# Altium PCB ScreenerMobo.PcbDoc (part 4 of 5)
Units mm, origin at the board's own origin, x right, y up, seen from the top; angles counter-clockwise.
Board outline 145 x 180 mm, 2 copper layers (Top Layer, Bottom Layer); 434 components, 355 nets, 1806 pads, 3000 vias.
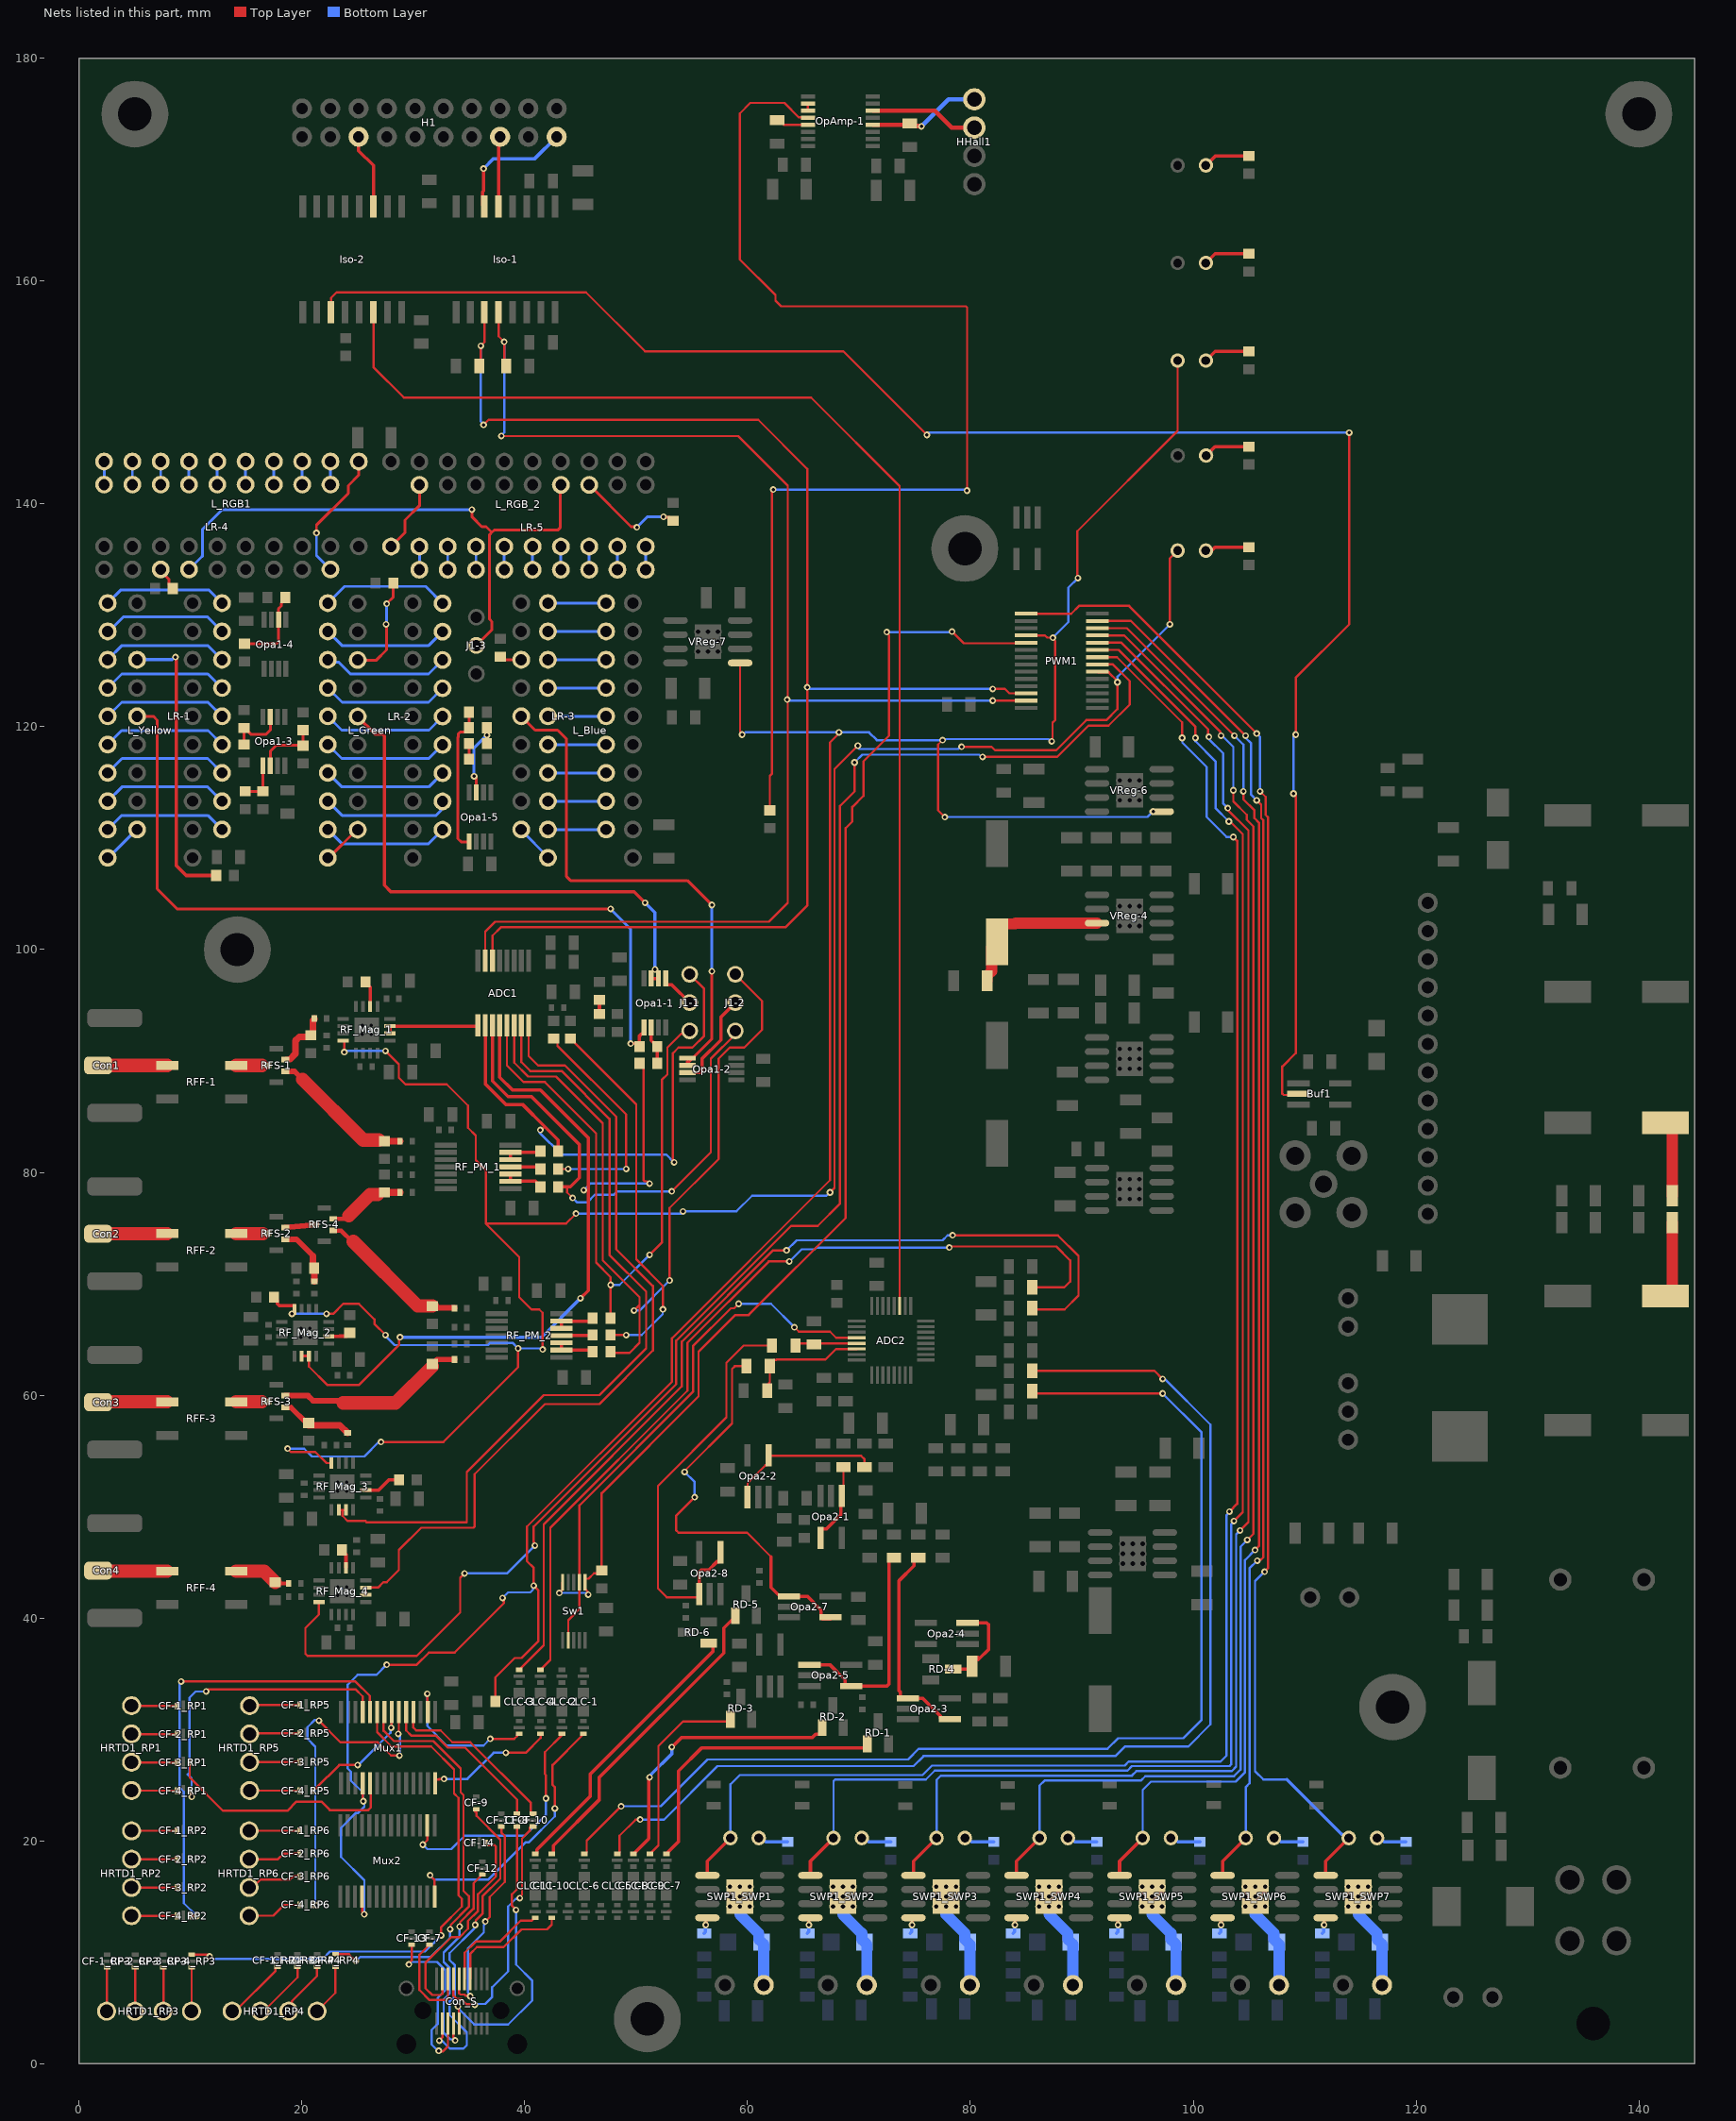
[diagram p4: the nets of this part, all layers, seen from the top]

## Via types
v1: diameter 0.6, hole 0.3, Top Layer to Bottom Layer, tented both sides, 1967 vias
v2: diameter 0.5, hole 0.25, Top Layer to Bottom Layer, tented both sides, 1025 vias
v3: diameter 0.9, hole 0.5, Top Layer to Bottom Layer, tented both sides, 8 vias

## Nets (pads, with @x,y where several pads share a name; then routed paths per layer and width w, separated by ;. In a path a pad name is that pad's centre, name@x,y a point inside that pad or via, vN(x,y) a via of type N, cw(c..) or ccw(c..) an arc to the next point about the centre after c; other vN are vias at no path point) (continued)
NetC6-18_2: C6-18.2 CE3-8.1 VReg-4.3 | length 14.2
  Top Layer w1: C6-18.2@81.5,97.2 81.5,97.65 81.9,98.05 81.9,100.2 CE3-8.1@82.4,100.7 82.4,101.8 82.9,102.3 84,102.3 84.076,102.376 VReg-4.3@91.368,102.376
NetC8-15_1: C8-15.1 OpAmp-1.13 | length 2.9
  Top Layer w0.2: C8-15.1@62.65,174.45 62.85,174.45 63.255,174.045 OpAmp-1.13@65.408,174.045
NetC8-16_2: C8-16.2 HHall1.1 OpAmp-1.4 | length 10.3
  Top Layer w0.4: OpAmp-1.4@71.25,174.045 C8-16.2@74.445,174.045 ; C8-16.2@74.55,174.15 C8-16.2@74.445,174.045 ; v1(75.6,173.9) 75.562,173.938 74.552,173.938 C8-16.2@74.445,174.045
  Bottom Layer w0.4: v1(75.6,173.9) 78.03,176.33 HHall1.1@80.35,176.33
NetC9-3_1: C9-3.1 Opa2-4.3 RD-4.3 | length 8.1
  Top Layer w0.3: RD-4.3@78.45,35.4 C9-3.1@79.9,35.4 ; Opa2-4.3@79.75,39.55 81.474,39.55 81.65,39.374 81.65,37.2 80.7,36.25 ; C9-3.1@80.15,35.65 80.15,36.1 80.5,36.45 80.7,36.45
NetCE3-2_2: CE3-2.2 R7-2.1 | length 6.8
  Top Layer w1: CE3-2.2@142.5,84.45 143,83.95 R7-2.1@143,77.9
NetCE3-3_2: CE3-3.2 R7-1.1 | length 6.8
  Top Layer w1: CE3-3.2@142.5,68.9 143,69.4 R7-1.1@143,75.5
NetCF-1_RP1_1: CF-1_RP1.1 HRTD1_RP1.1 | length 4.1
  Top Layer w0.2: HRTD1_RP1.1@4.7,32.13 4.73,32.1 CF-1_RP1.1@8.775,32.1
NetCF-1_RP2_1: CF-1_RP2.1 HRTD1_RP2.1 | length 4.1
  Top Layer w0.2: HRTD1_RP2.1@4.7,20.89 4.71,20.9 CF-1_RP2.1@8.775,20.9
NetCF-1_RP3_1: CF-1_RP3.1 HRTD1_RP3.1 | length 3.9
  Top Layer w0.2: HRTD1_RP3.1@2.46,4.7 2.5,4.74 CF-1_RP3.1@2.5,8.625
NetCF-1_RP4_1: CF-1_RP4.1 HRTD1_RP4.1 | length 5.9
  Top Layer w0.2: HRTD1_RP4.1@13.73,4.7 14,4.7 17.625,8.325 17.625,8.575 17.725,8.675 CF-1_RP4.1@17.8,8.675
NetCF-1_RP5_1: CF-1_RP5.1 HRTD1_RP5.1 | length 4.4
  Top Layer w0.2: HRTD1_RP5.1@15.37,32.2 CF-1_RP5.1@19.775,32.2
NetCF-1_RP6_1: CF-1_RP6.1 HRTD1_RP6.1 | length 4.5
  Top Layer w0.2: HRTD1_RP6.1@15.26,20.9 CF-1_RP6.1@19.775,20.9
NetCF-2_RP1_1: CF-2_RP1.1 HRTD1_RP1.2 | length 4.1
  Top Layer w0.2: HRTD1_RP1.2@4.7,29.59 4.723,29.567 CF-2_RP1.1@8.775,29.567
NetCF-2_RP2_1: CF-2_RP2.1 HRTD1_RP2.2 | length 4.1
  Top Layer w0.2: HRTD1_RP2.2@4.7,18.35 CF-2_RP2.1@8.775,18.35
NetCF-2_RP3_1: CF-2_RP3.1 HRTD1_RP3.2 | length 3.9
  Top Layer w0.2: HRTD1_RP3.2@5,4.7 5.033,4.733 CF-2_RP3.1@5.033,8.625
NetCF-2_RP4_1: CF-2_RP4.1 HRTD1_RP4.2 | length 5.5
  Top Layer w0.2: HRTD1_RP4.2@16.27,4.7 16.55,4.7 19.6,7.75 CF-2_RP4.1@19.6,8.675
NetCF-2_RP5_1: CF-2_RP5.1 HRTD1_RP5.2 | length 4.4
  Top Layer w0.2: HRTD1_RP5.2@15.343,29.633 CF-2_RP5.1@19.775,29.633
NetCF-2_RP6_1: CF-2_RP6.1 HRTD1_RP6.2 | length 4.7
  Top Layer w0.2: HRTD1_RP6.2@15.25,18.35 17.85,18.35 18.35,18.85 CF-2_RP6.1@19.775,18.85
NetCF-3_RP1_1: CF-3_RP1.1 HRTD1_RP1.3 | length 4.1
  Top Layer w0.2: HRTD1_RP1.3@4.7,27.05 4.717,27.033 CF-3_RP1.1@8.775,27.033
NetCF-3_RP2_1: CF-3_RP2.1 HRTD1_RP2.3 | length 4.1
  Top Layer w0.2: HRTD1_RP2.3@4.7,15.81 4.71,15.8 CF-3_RP2.1@8.775,15.8
NetCF-3_RP3_1: CF-3_RP3.1 HRTD1_RP3.3 | length 3.9
  Top Layer w0.2: HRTD1_RP3.3@7.54,4.7 7.567,4.727 CF-3_RP3.1@7.567,8.625
NetCF-3_RP4_1: CF-3_RP4.1 HRTD1_RP4.3 | length 5
  Top Layer w0.2: HRTD1_RP4.3@18.81,4.7 19.097,4.987 19.097,5.597 21.35,7.85 CF-3_RP4.1@21.35,8.675
NetCF-3_RP5_1: CF-3_RP5.1 HRTD1_RP5.3 | length 4.5
  Top Layer w0.2: HRTD1_RP5.3@15.317,27.067 CF-3_RP5.1@19.775,27.067
NetCF-3_RP6_1: CF-3_RP6.1 HRTD1_RP6.3 | length 4.9
  Top Layer w0.2: HRTD1_RP6.3@15.25,15.81 15.577,15.81 16.288,16.52 18.92,16.52 19.2,16.8 CF-3_RP6.1@19.775,16.8
NetCF-4_RP1_1: CF-4_RP1.1 HRTD1_RP1.4 | length 4.1
  Top Layer w0.2: HRTD1_RP1.4@4.7,24.51 4.71,24.5 CF-4_RP1.1@8.775,24.5
NetCF-4_RP2_1: CF-4_RP2.1 HRTD1_RP2.4 | length 4.1
  Top Layer w0.2: HRTD1_RP2.4@4.7,13.27 4.72,13.25 CF-4_RP2.1@8.775,13.25
NetCF-4_RP3_1: CF-4_RP3.1 HRTD1_RP3.4 | length 3.9
  Top Layer w0.2: HRTD1_RP3.4@10.1,4.72 CF-4_RP3.1@10.1,8.625
NetCF-4_RP4_1: CF-4_RP4.1 HRTD1_RP4.4 | length 4.7
  Top Layer w0.2: HRTD1_RP4.4@21.35,4.7 23,6.35 CF-4_RP4.1@23,8.675
NetCF-4_RP5_1: CF-4_RP5.1 HRTD1_RP5.4 | length 4.5
  Top Layer w0.2: HRTD1_RP5.4@15.31,24.5 CF-4_RP5.1@19.775,24.5
NetCF-4_RP6_1: CF-4_RP6.1 HRTD1_RP6.4 | length 4.9
  Top Layer w0.2: HRTD1_RP6.4@15.25,13.27 17.425,13.27 18.405,14.25 CF-4_RP6.1@19.775,14.25
NetCLC-1_2: CLC-1.2 Mux2.28 | length 24.3
  Top Layer w0.2: v1(31.5,16.9) 31.9,16.5 Mux2.28@31.9,15 ; v1(42.7,22.9) 42.7,24.804 42.5,25.004 42.5,26.8 CLC-1.2@45.2,29.5
  Bottom Layer w0.2: v1(31.5,16.9) 31.9,16.5 36.7,16.5 40.05,19.85 40.353,19.85 42.7,22.197 v1(42.7,22.9)
NetCLC-2_2: CLC-2.2 Mux2.2 | length 22.2
  Top Layer w0.2: v1(30.85,19.65) 31.25,20.05 Mux2.2@31.25,21.4 ; v1(41.9,23.8) 41.9,25.879 41.8,25.979 41.8,27.95 CLC-2.2@43.35,29.5
  Bottom Layer w0.2: v1(30.85,19.65) 31.25,19.25 33.4,19.25 34.6,20.45 40,20.45 41.9,22.35 v1(41.9,23.8)
NetCLC-3_2: CLC-3.2 Mux1.2 | length 14
  Top Layer w0.2: Mux1.2@31.25,31.6 v1(31.25,33.2) ; v1(36.9,29.15) 39.05,29.15 39.3,29.4 39.3,29.5 39.4,29.6 CLC-3.2@39.5,29.6
  Bottom Layer w0.2: v1(31.25,33.2) 31.25,30.3 33,28.55 36.3,28.55 v1(36.9,29.15)
NetCLC-4_2: CLC-4.2 Mux1.28 | length 11.7
  Top Layer w0.2: Mux1.28@31.95,25.15 31.95,25.433 32.025,25.508 32.308,25.508 32.35,25.55 v1(32.75,25.55) ; v1(38.3,27.9) 40.1,27.9 41.417,29.217 CLC-4.2@41.417,29.6
  Bottom Layer w0.2: v1(32.75,25.55) 34.85,25.55 37.2,27.9 v1(38.3,27.9)
NetCLC-5_1: CLC-5.1 R12-5.1 | length 103.9
  Top Layer w0.2: CLC-5.1@48.294,18.825 48.394,18.825 48.494,18.925 48.494,19.036 48.5,19.042 48.5,20.45 49.95,21.9 v1(50.35,21.9) ; R12-5.1@85.55,62.2 96.5,62.2 v1(97.25,61.45)
  Bottom Layer w0.2: v1(50.35,21.9) 52.5,21.9 57.3,26.7 74.9,26.7 75.8,27.6 93,27.6 93.85,28.45 99.55,28.45 101.55,30.45 101.55,57.35 97.45,61.45 v1(97.25,61.45)
NetCLC-6_1: CLC-6.1 R12-6.1 | length 103.5
  Top Layer w0.2: CLC-6.1@45.356,18.825 45.456,18.825 45.556,18.925 45.556,20.006 v1(48.65,23.1) ; R12-6.1@85.55,60.35 85.75,60.15 v1(97.25,60.15)
  Bottom Layer w0.2: v1(48.65,23.1) 52.2,23.1 56.4,27.3 74.4,27.3 75.35,28.25 92.3,28.25 93.25,29.2 99.1,29.2 100.75,30.85 100.75,56.65 v1(97.25,60.15)
NetCLC-7_1: CLC-7.1 RD-1.1 | length 25.8
  Top Layer w0.3: CLC-7.1@52.7,18.825 53.8,19.925 53.8,26.25 55.9,28.35 56.9,28.35 57.15,28.35 70.5,28.35 RD-1.1@70.75,28.6
NetCLC-8_1: CLC-8.1 RD-2.1 | length 25.4
  Top Layer w0.3: CLC-8.1@49.762,18.825 51.119,20.181 51.119,25.407 51.143,25.43 51.143,25.643 v1(51.2,25.7) ; v1(53.2,28.4) 54.05,29.25 65.8,29.25 66.107,29.557 66.45,29.557 66.7,29.807 RD-2.1@66.7,30.15
  Bottom Layer w0.3: v1(51.2,25.7) 51.2,25.781 51.35,25.931 51.35,25.95 53.2,27.8 v1(53.2,28.4)
NetCLC-9_1: CLC-9.1 RD-3.1 | length 17.5
  Top Layer w0.2: CLC-9.1@51.231,18.825 52,19.594 52,28.5 54.2,30.7 RD-3.1@58.55,30.7
NetCLC-10_1: CLC-10.1 RD-5.1 | length 27.9
  Top Layer w0.3: CLC-10.1@42.419,18.825 42.519,18.825 42.569,18.875 42.569,19.569 46.697,23.697 46.697,25.697 57.85,36.85 57.85,39.1 RD-5.1@58.7,39.95
NetCLC-11_1: CLC-11.1 RD-6.1 | length 25.8
  Top Layer w0.3: CLC-11.1@40.95,18.825 41.05,18.825 41.1,18.875 41.1,19.2 45.888,23.988 45.888,25.988 56.9,37 56.9,37.5 56.65,37.75 RD-6.1@56.5,37.75
NetCon1_1: Con1.1 RFF-1.1 | length 6.2
  Top Layer w1.2: Con1.1@1.7,89.6 2.35,89.6 RFF-1.1@7.9,89.6
NetCon2_1: Con2.1 RFF-2.1 | length 6.2
  Top Layer w1.2: Con2.1@1.7,74.483 2.35,74.5 RFF-2.1@7.9,74.5
NetCon3_1: Con3.1 RFF-3.1 | length 6.2
  Top Layer w1.2: Con3.1@1.7,59.367 2.35,59.4 RFF-3.1@7.9,59.4
NetCon4_1: Con4.1 RFF-4.1 | length 6.2
  Top Layer w1.2: Con4.1@1.7,44.25 2.35,44.2 RFF-4.1@7.9,44.2
NetHHall1_2: HHall1.2 OpAmp-1.6 | length 9.7
  Top Layer w0.4: OpAmp-1.6@71.25,175.315 76.785,175.315 78.31,173.79 HHall1.2@80.35,173.79
NetJ1-1_2: J1-1.2 Opa1-1.5 | length 3.3
  Top Layer w0.3: Opa1-1.5@52.65,97.4 52.65,96.9 52.725,96.825 53.215,96.825 J1-1.2@54.8,95.24
NetJ1-2_2: J1-2.2 Opa1-2.3 | length 8.7
  Top Layer w0.3: Opa1-2.3@54.6,88.95 55.724,88.95 55.9,89.126 55.9,90.2 57.6,91.9 57.6,93.94 J1-2.2@58.9,95.24
NetL_Blue_11: L_Blue.11 LR-3.10 | length 5.2
  Bottom Layer w0.254: L_Blue.11@42.08,131.1 LR-3.10@47.3,131.1
NetL_Blue_12: L_Blue.12 LR-3.11 | length 5.2
  Bottom Layer w0.254: L_Blue.12@42.08,128.56 LR-3.11@47.3,128.56
NetL_Blue_13: L_Blue.13 LR-3.12 | length 5.2
  Bottom Layer w0.254: L_Blue.13@42.08,126.02 LR-3.12@47.3,126.02
NetL_Blue_14: L_Blue.14 LR-3.13 | length 5.2
  Bottom Layer w0.254: L_Blue.14@42.08,123.48 LR-3.13@47.3,123.48
NetL_Blue_15: L_Blue.15 LR-3.14 | length 5.2
  Bottom Layer w0.254: L_Blue.15@42.08,120.94 LR-3.14@47.3,120.94
NetL_Blue_16: L_Blue.16 LR-3.15 | length 5.2
  Bottom Layer w0.254: L_Blue.16@42.08,118.4 LR-3.15@47.3,118.4
NetL_Blue_17: L_Blue.17 LR-3.16 | length 5.2
  Bottom Layer w0.254: L_Blue.17@42.08,115.86 LR-3.16@47.3,115.86
NetL_Blue_18: L_Blue.18 LR-3.17 | length 5.2
  Bottom Layer w0.254: L_Blue.18@42.08,113.32 LR-3.17@47.3,113.32
NetL_Blue_19: L_Blue.19 LR-3.18 | length 5.2
  Bottom Layer w0.254: L_Blue.19@42.08,110.78 LR-3.18@47.3,110.78
NetL_Blue_20: L_Blue.20 LR-3.1 | length 3.5
  Bottom Layer w0.254: LR-3.1@39.68,110.78 39.68,110.71 42.08,108.31 L_Blue.20@42.08,108.24
NetL_Green_11: L_Green.11 LR-2.10 | length 11.6
  Bottom Layer w0.25: L_Green.11@22.32,131.1 23.82,132.6 31.1,132.6 LR-2.10@32.62,131.08
NetL_Green_12: L_Green.12 LR-2.11 | length 11.3
  Bottom Layer w0.25: L_Green.12@22.32,128.56 23.58,127.3 31.38,127.3 LR-2.11@32.62,128.54
NetL_Green_13: L_Green.13 LR-2.12 | length 11.3
  Bottom Layer w0.25: L_Green.13@22.32,126.02 22.521,125.819 23.281,125.819 24.35,124.75 31.37,124.75 LR-2.12@32.62,126
NetL_Green_14: L_Green.14 LR-2.13 | length 11.4
  Bottom Layer w0.25: L_Green.14@22.32,123.48 23.6,122.2 31.36,122.2 LR-2.13@32.62,123.46
NetL_Green_15: L_Green.15 LR-2.14 | length 11.3
  Bottom Layer w0.25: L_Green.15@22.32,120.94 23.56,119.7 31.4,119.7 LR-2.14@32.62,120.92
NetL_Green_16: L_Green.16 LR-2.15 | length 11.3
  Bottom Layer w0.25: L_Green.16@22.32,118.4 23.57,117.15 31.39,117.15 LR-2.15@32.62,118.38
NetL_Green_17: L_Green.17 LR-2.16 | length 11.3
  Bottom Layer w0.25: L_Green.17@22.32,115.86 23.58,114.6 31.38,114.6 LR-2.16@32.62,115.84
NetL_Green_18: L_Green.18 LR-2.17 | length 11.7
  Bottom Layer w0.254: L_Green.18@22.32,113.32 23.59,112.05 32.05,112.05 32.45,112.45 32.45,113.13 LR-2.17@32.62,113.3
NetL_Green_19: L_Green.19 LR-2.18 | length 11.4
  Bottom Layer w0.254: L_Green.19@22.32,110.78 23.6,109.5 31.36,109.5 LR-2.18@32.62,110.76
NetL_Green_20: L_Green.20 LR-2.1 | length 3.7
  Top Layer w0.254: L_Green.20@22.32,108.24 22.4,108.24 24.92,110.76 LR-2.1@25,110.76
NetL_RGB1_11: L_RGB1.11 LR-4.1 | length 12.1
  Top Layer w0.25: v1(21.3,137.4) 21.3,138.1 24.15,140.95 24.15,141.65 25.1,142.6 L_RGB1.11@25.1,143.812
  Bottom Layer w0.25: v1(21.3,137.4) 21.3,135.38 LR-4.1@22.56,134.12 ; L_RGB1.11@25.1,143.551 L_RGB1.11@25.1,143.812
NetL_RGB1_12: L_RGB1.12 LR-4.18 | length 2.1
  Bottom Layer w0.25: LR-4.18@22.56,141.74 L_RGB1.12@22.56,143.812
NetL_RGB1_13: L_RGB1.13 LR-4.17 | length 2.1
  Bottom Layer w0.25: LR-4.17@20.02,141.74 L_RGB1.13@20.02,143.812
NetL_RGB1_14: L_RGB1.14 LR-4.16 | length 2.1
  Bottom Layer w0.25: LR-4.16@17.48,141.74 L_RGB1.14@17.48,143.812
NetL_RGB1_15: L_RGB1.15 LR-4.15 | length 2.1
  Bottom Layer w0.25: LR-4.15@14.94,141.74 L_RGB1.15@14.94,143.812
NetL_RGB1_16: L_RGB1.16 LR-4.14 | length 2.1
  Bottom Layer w0.25: LR-4.14@12.4,141.74 L_RGB1.16@12.4,143.812
NetL_RGB1_17: L_RGB1.17 LR-4.13 | length 2.1
  Bottom Layer w0.25: LR-4.13@9.86,141.74 L_RGB1.17@9.86,143.812
NetL_RGB1_18: L_RGB1.18 LR-4.12 | length 2.1
  Bottom Layer w0.25: LR-4.12@7.32,141.74 L_RGB1.18@7.32,143.812
NetL_RGB1_19: L_RGB1.19 LR-4.11 | length 2.1
  Bottom Layer w0.25: LR-4.11@4.78,141.74 L_RGB1.19@4.78,143.812
NetL_RGB1_20: L_RGB1.20 LR-4.10 | length 2.1
  Bottom Layer w0.25: LR-4.10@2.24,141.74 L_RGB1.20@2.24,143.812
NetL_RGB_2_11: L_RGB_2.11 LR-5.1 | length 7
  Top Layer w0.25: L_RGB_2.11@28,136.18 29.25,137.43 29.25,138.55 30.54,139.84 LR-5.1@30.54,141.72
  Bottom Layer w0.25: L_RGB_2.11@28,136.18 L_RGB_2.11@28,136.545
NetL_RGB_2_12: L_RGB_2.12 LR-5.18 | length 2.1
  Bottom Layer w0.25: LR-5.18@30.54,134.1 L_RGB_2.12@30.54,136.18
NetL_RGB_2_13: L_RGB_2.13 LR-5.17 | length 2.1
  Bottom Layer w0.25: LR-5.17@33.08,134.1 L_RGB_2.13@33.08,136.18
NetL_RGB_2_14: L_RGB_2.14 LR-5.16 | length 2.1
  Bottom Layer w0.25: LR-5.16@35.62,134.1 L_RGB_2.14@35.62,136.18
NetL_RGB_2_15: L_RGB_2.15 LR-5.15 | length 2.1
  Bottom Layer w0.25: LR-5.15@38.16,134.1 L_RGB_2.15@38.16,136.18
NetL_RGB_2_16: L_RGB_2.16 LR-5.14 | length 2.1
  Bottom Layer w0.25: LR-5.14@40.7,134.1 L_RGB_2.16@40.7,136.18
NetL_RGB_2_17: L_RGB_2.17 LR-5.13 | length 2.1
  Bottom Layer w0.25: LR-5.13@43.24,134.1 L_RGB_2.17@43.24,136.18
NetL_RGB_2_18: L_RGB_2.18 LR-5.12 | length 2.1
  Bottom Layer w0.25: LR-5.12@45.78,134.1 L_RGB_2.18@45.78,136.18
NetL_RGB_2_19: L_RGB_2.19 LR-5.11 | length 2.1
  Bottom Layer w0.25: LR-5.11@48.32,134.1 L_RGB_2.19@48.32,136.18
NetL_RGB_2_20: L_RGB_2.20 LR-5.10 | length 2.1
  Bottom Layer w0.25: LR-5.10@50.86,134.1 L_RGB_2.20@50.86,136.18
NetL_Yellow_11: L_Yellow.11 LR-1.10 | length 11.3
  Bottom Layer w0.254: L_Yellow.11@2.56,131.1 3.76,132.3 11.62,132.3 LR-1.10@12.82,131.1
NetL_Yellow_12: L_Yellow.12 LR-1.11 | length 11.3
  Bottom Layer w0.25: L_Yellow.12@2.56,128.56 2.66,128.56 3.95,129.85 11.53,129.85 LR-1.11@12.82,128.56
NetL_Yellow_13: L_Yellow.13 LR-1.12 | length 11.3
  Bottom Layer w0.25: L_Yellow.13@2.56,126.02 3.84,127.3 11.54,127.3 LR-1.12@12.82,126.02
NetL_Yellow_14: L_Yellow.14 LR-1.13 | length 11.3
  Bottom Layer w0.25: L_Yellow.14@2.56,123.48 3.83,124.75 11.55,124.75 LR-1.13@12.82,123.48
NetL_Yellow_15: L_Yellow.15 LR-1.14 | length 11.3
  Bottom Layer w0.25: L_Yellow.15@2.56,120.94 3.82,122.2 11.56,122.2 LR-1.14@12.82,120.94
NetL_Yellow_16: L_Yellow.16 LR-1.15 | length 11.3
  Bottom Layer w0.25: L_Yellow.16@2.56,118.4 3.81,119.65 11.57,119.65 LR-1.15@12.82,118.4
NetL_Yellow_17: L_Yellow.17 LR-1.16 | length 11.3
  Bottom Layer w0.25: L_Yellow.17@2.56,115.86 3.85,117.15 11.53,117.15 LR-1.16@12.82,115.86
NetL_Yellow_18: L_Yellow.18 LR-1.17 | length 11.3
  Bottom Layer w0.25: L_Yellow.18@2.56,113.32 3.84,114.6 11.54,114.6 LR-1.17@12.82,113.32
NetL_Yellow_19: L_Yellow.19 LR-1.18 | length 11.3
  Bottom Layer w0.25: L_Yellow.19@2.56,110.78 3.83,112.05 11.55,112.05 LR-1.18@12.82,110.78
NetL_Yellow_20: L_Yellow.20 LR-1.1 | length 3.7
  Bottom Layer w0.25: L_Yellow.20@2.56,108.24 2.61,108.24 5.15,110.78 LR-1.1@5.2,110.78
NetLL-1_SWP1_2: LL-1_SWP1.2 R10-1_SWP1.2 | length 2.7
  Top Layer w0.3: LL-1_SWP1.2@61,20.25 LL-1_SWP1.2@61.271,20.25
  Bottom Layer w0.3: LL-1_SWP1.2@61.271,20.25 61.621,19.9 R10-1_SWP1.2@63.6,19.9
NetLL-1_SWP2_2: LL-1_SWP2.2 R10-1_SWP2.2 | length 2.7
  Top Layer w0.3: LL-1_SWP2.2@70.25,20.25 LL-1_SWP2.2@70.521,20.25
  Bottom Layer w0.3: LL-1_SWP2.2@70.521,20.25 70.871,19.9 R10-1_SWP2.2@72.85,19.9
NetLL-1_SWP3_2: LL-1_SWP3.2 R10-1_SWP3.2 | length 2.7
  Top Layer w0.3: LL-1_SWP3.2@79.5,20.25 LL-1_SWP3.2@79.771,20.25
  Bottom Layer w0.3: LL-1_SWP3.2@79.771,20.25 80.121,19.9 R10-1_SWP3.2@82.1,19.9
NetLL-1_SWP4_2: LL-1_SWP4.2 R10-1_SWP4.2 | length 2.7
  Top Layer w0.3: LL-1_SWP4.2@88.75,20.25 LL-1_SWP4.2@89.021,20.25
  Bottom Layer w0.3: LL-1_SWP4.2@89.021,20.25 89.371,19.9 R10-1_SWP4.2@91.35,19.9
NetLL-1_SWP5_2: LL-1_SWP5.2 R10-1_SWP5.2 | length 2.7
  Top Layer w0.3: LL-1_SWP5.2@98,20.25 LL-1_SWP5.2@98.271,20.25
  Bottom Layer w0.3: LL-1_SWP5.2@98.271,20.25 98.621,19.9 R10-1_SWP5.2@100.6,19.9
NetLL-1_SWP6_2: LL-1_SWP6.2 R10-1_SWP6.2 | length 2.7
  Top Layer w0.3: LL-1_SWP6.2@107.25,20.25 LL-1_SWP6.2@107.521,20.25
  Bottom Layer w0.3: LL-1_SWP6.2@107.521,20.25 107.871,19.9 R10-1_SWP6.2@109.85,19.9
NetLL-1_SWP7_2: LL-1_SWP7.2 R10-1_SWP7.2 | length 2.7
  Top Layer w0.3: LL-1_SWP7.2@116.5,20.25 LL-1_SWP7.2@116.771,20.25
  Bottom Layer w0.3: LL-1_SWP7.2@116.771,20.25 117.121,19.9 R10-1_SWP7.2@119.1,19.9
NetLL-2_2: LL-2.2 R10-2.2 | length 4.2
  Top Layer w0.3: LL-2.2@101.14,135.313 101.952,136.125 R10-2.2@105,136.125
NetLL-3_2: LL-3.2 R10-3.2 | length 4.2
  Top Layer w0.3: LL-3.2@101.15,144.35 101.95,145.15 R10-3.2@105,145.15
NetLL-4_2: LL-4.2 R10-4.2 | length 4.2
  Top Layer w0.3: LL-4.2@101.14,152.875 101.965,153.7 R10-4.2@105,153.7
NetLL-5_2: LL-5.2 R8-6.1 | length 4.2
  Top Layer w0.3: LL-5.2@101.14,170.4 101.99,171.25 R8-6.1@105,171.25
NetLL-6_2: LL-6.2 R10-6.2 | length 4.2
  Top Layer w0.3: LL-6.2@101.14,161.637 101.977,162.475 R10-6.2@105,162.475
NetLR-1_7: LR-1.7 R8-1.2 | length 26.2
  Top Layer w0.3: v1(8.65,126.25) 8.65,126.2 8.7,126.15 8.7,107.55 9.6,106.65 R8-1.2@12.3,106.65
  Bottom Layer w0.3: LR-1.7@5.2,126.02 8.339,126.02 8.569,126.25 v1(8.65,126.25)
NetLR-2_7: LR-2.7 R8-2.2 | length 9.3
  Top Layer w0.254: LR-2.7@25,126 25.05,125.95 26.65,125.95 27.6,126.9 27.6,129.15 v1(27.55,129.2) ; v1(27.6,131.05) 28.2,131.65 R8-2.2@28.2,132.9
  Bottom Layer w0.254: v1(27.55,129.2) 27.575,129.225 27.575,131.025 v1(27.6,131.05)
NetLR-3_7: LR-3.7 R8-3.2 | length 2
  Top Layer w0.254: R8-3.2@37.8,126.3 38.08,126.02 LR-3.7@39.68,126.02
NetLR-4_7: LR-4.7 R8-4.2 | length 2.2
  Top Layer w0.254: LR-4.7@7.32,134.12 7.32,133.964 8.077,133.207 8.077,132.723 R8-4.2@8.4,132.4
NetLR-5_7: LR-5.7 R8-5.2 | length 9.6
  Top Layer w0.25: LR-5.7@45.78,141.72 49.533,137.967 49.983,137.967 v1(50.05,137.9) ; v1(52.45,138.85) 52.475,138.825 52.975,138.825 R8-5.2@53.3,138.5
  Bottom Layer w0.25: v1(50.05,137.9) 51,138.85 v1(52.45,138.85)
NetOpa1-1_2: Opa1-1.2 R9-1.2 R9-2.1 | length 3.5
  Top Layer w0.3: Opa1-1.2@51.35,93 51.35,91.85 51.55,91.65 51.6,91.65 51.9,91.35 R9-2.1@51.9,91.3 R9-1.2@51.9,89.8
NetOpa1-3_3: Opa1-3.3 R1-6.2 R10-1.1 | length 5.5
  Top Layer w0.254: R1-6.2@14.8,118.4 R10-1.1@14.8,119.9 14.85,119.9 15.45,119.3 16.75,119.3 17.15,119.7 Opa1-3.3@17.15,120.9
NetOpa1-3_5: Opa1-3.5 R1-17.2 R1-18.1 | length 3.9
  Top Layer w0.254: R1-18.1@14.9,114.2 R1-17.2@16.5,114.2 Opa1-3.5@16.5,116.5
NetOpa1-3_6: Opa1-3.6 R1-19.1 R1-20.1 | length 5.9
  Top Layer w0.254: Opa1-3.6@17.15,116.5 17.15,117.8 17.7,118.35 20.05,118.35 R1-19.1@20.1,118.3 R1-20.1@20.1,119.7
NetOpa1-4_6: Opa1-4.6 R1-11.1 R1-12.1 | length 7.3
  Top Layer w0.254: R1-12.1@14.85,127.45 17.7,127.45 17.9,127.65 17.9,130.6 18.15,130.85 18.15,131.078 18.177,131.105 18.177,131.227 18.5,131.55 R1-11.1@18.5,131.6
NetOpa1-5_3: Opa1-5.3 R1-8.2 R1-9.1 | length 5.7
  Top Layer w0.254: v1(35.45,115.55) 35.501,115.55 35.65,115.401 Opa1-5.3@35.65,114.1
  Bottom Layer w0.254: v1(35.45,115.55) 35.45,118.1 v1(36.6,119.25)
NetOpa1-5_5: Opa1-5.5 R1-9.2 R1-10.1 | length 13.2
  Top Layer w0.254: Opa1-5.5@35,109.7 34.95,109.65 34.3,109.65 34,109.95 34,119.05 34.05,119.1 34.05,119.378 34.199,119.527 34.677,119.527 35,119.85 R1-9.2@35,119.9 R1-10.1@35,121.3
NetOpa2-1_1: Opa2-1.1 Opa2-1.4 R12-1.1 | length 7.4
  Top Layer w0.2: Opa2-1.1@68.45,50.95 68.6,51.1 R12-1.1@68.6,53.55
  Top Layer w0.3: Opa2-1.4@66.55,47.2 66.55,47.856 66.675,47.981 67.081,47.981 68.369,49.269 68.369,50.869 Opa2-1.1@68.45,50.95
NetOpa2-2_1: Opa2-2.1 Opa2-2.4 R12-2.1 | length 14.1
  Top Layer w0.2: Opa2-2.1@60,50.85 60,52.1 61.6,53.7 61.725,53.7 61.9,53.875 Opa2-2.4@61.9,54.6 61.95,54.55 70.2,54.55 70.5,54.25 R12-2.1@70.5,53.55
NetOpa2-3_1: Opa2-3.1 Opa2-3.4 R12-7.1 | length 18.7
  Top Layer w0.3: R12-7.1@75.317,45.4 75.226,45.4 74.926,45.1 74.926,44.676 73.6,43.35 73.6,33.475 73.726,33.349 73.726,32.925 73.851,32.8 75.7,32.8 77.3,31.2 77.3,31.025 77.425,30.9 Opa2-3.4@78.15,30.9
NetOpa2-5_1: Opa2-5.1 Opa2-5.4 R12-8.1 | length 19.8
  Top Layer w0.3: Opa2-5.1@65.55,35.8 65.574,35.776 67.424,35.776 68.751,34.449 68.751,34.025 68.876,33.9 72.524,33.9 72.7,34.076 72.7,45.1 73,45.4 R12-8.1@73.133,45.4
NetOpa2-7_1: Opa2-7.1 Opa2-7.4 R12-11.1 | length 37.9
  Top Layer w0.2: v1(54.35,53.1) 54.35,53.2 58.6,57.45 58.6,62.35 58.85,62.6 R12-11.1@59.9,62.6 ; v1(55.25,50.85) 53.6,49.2 53.6,47.85 53.8,47.65 59.95,47.65 62.1,45.5
  Top Layer w0.3: 62.1,45.5 62.1,42.75 62.775,42.075 63.575,42.075 Opa2-7.1@63.7,41.95 64.124,41.95 Opa2-7.1@64.249,42.075 ; Opa2-7.1@64.249,41.95 65.35,41.95 66.6,40.7 66.6,40.025 66.725,39.9 Opa2-7.4@67.45,39.9
  Bottom Layer w0.2: v1(54.35,53.1) 55.25,52.2 v1(55.25,50.85)
NetOpa2-8_1: Opa2-8.1 Opa2-8.4 R12-12.1 | length 36.8
  Top Layer w0.2: Opa2-8.1@55.65,42.15 55.65,42.025 55.475,41.85 52.75,41.85 51.95,42.65 51.95,51.85 58.1,58 58.1,62.9 59.65,64.45 R12-12.1@62.2,64.45
  Top Layer w0.3: Opa2-8.1@55.65,42.15 55.65,44.124 55.826,44.3 56.5,44.3 57.25,45.05 57.425,45.05 57.55,45.175 Opa2-8.4@57.55,45.9
NetOpAmp-1_10: OpAmp-1.10 OpAmp-1.11 | length 0.6
  Top Layer w0.2: OpAmp-1.11@65.408,175.315 OpAmp-1.10@65.408,175.95
NetOpAmp-1_12: OpAmp-1.12 R00.2 | length 105.4
  Top Layer w0.2: R00.2@62,112.5 62,115.6 62.2,115.8 62.2,141.2 v1(62.3,141.3) ; OpAmp-1.12@65.408,174.68 65.378,174.71 64.59,174.71 63.3,176 60.242,176 59.3,175.058 59.3,161.95 62.5,158.75 62.5,158.25 63,157.75 79.583,157.75 79.7,157.633 v1(79.7,141.2)
  Bottom Layer w0.2: v1(62.3,141.3) 79.492,141.3 79.592,141.2 v1(79.7,141.2)
NetR1-3_1: R1-3.1 R1-4.2 | length 1.3
  Top Layer w0.3: R1-4.2@46.7,94.2 R1-3.1@46.7,95.5
NetR1-7_2: R1-7.2 R1-8.1 | length 1.4
  Top Layer w0.254: R1-7.2@35,117.1 R1-8.1@35,118.5
NetR3-1_2: R3-1.2 RF_Mag_1.10 | length 2.4
  Top Layer w0.3: R3-1.2@25.7,97.1 25.7,97.05 26.125,96.625 RF_Mag_1.10@26.125,94.9
NetR3-2_2: R3-2.2 RF_Mag_2.10 | length 2
  Top Layer w0.3: RF_Mag_2.10@22.4,65.275 23.35,65.275 23.375,65.3 24,65.3 R3-2.2@24.3,65.6
NetR3-3_2: R3-3.2 RF_Mag_3.10 | length 3.4
  Top Layer w0.3: RF_Mag_3.10@25.725,51.475 26.875,51.475 27.8,52.4 R3-3.2@28.7,52.4
NetR3-4_2: R3-4.2 RF_Mag_4.10 | length 1.7
  Top Layer w0.3: R3-4.2@23.6,46.1 23.6,46.05 23.95,45.7 RF_Mag_4.10@23.95,44.5
NetR4-1_2: R4-1.2 RF_PM_1.12 RF_PM_1.13 | length 3.4
  Top Layer w0.3: RF_PM_1.12@38.7,81.15 RF_PM_1.13@38.7,81.8 41.3,81.8 R4-1.2@41.4,81.9
NetR4-2_2: R4-2.2 RF_PM_1.9 RF_PM_1.10 | length 3.6
  Top Layer w0.3: RF_PM_1.10@38.7,79.85 RF_PM_1.9@38.7,79.2 40.95,79.2 41.4,78.75 R4-2.2@41.4,78.7
NetR4-3_2: R4-3.2 RF_PM_1.11 | length 2.8
  Top Layer w0.3: RF_PM_1.11@38.7,80.5 41.2,80.5 R4-3.2@41.4,80.3
NetR4-4_2: R4-4.2 RF_PM_2.12 RF_PM_2.13 | length 3.6
  Top Layer w0.3: RF_PM_2.12@43.3,66 RF_PM_2.13@43.3,66.65 45.85,66.65 R4-4.2@46.1,66.9
NetR4-5_2: R4-5.2 RF_PM_2.11 | length 2.8
  Top Layer w0.3: RF_PM_2.11@43.3,65.35 46.05,65.35 R4-5.2@46.1,65.4
NetR4-6_2: R4-6.2 RF_PM_2.9 RF_PM_2.10 | length 3.5
  Top Layer w0.3: RF_PM_2.10@43.3,64.7 RF_PM_2.9@43.3,64.05 45.95,64.05 R4-6.2@46.1,63.9
NetR6-1_SWP1_2: R6-1_SWP1.2 SWP1_SWP1.4 | length 1.5
  Top Layer w0.3: v1(56.25,12.45) 56.25,12.945 56.389,13.084 SWP1_SWP1.4@56.39,13.084
  Bottom Layer w0.3: R6-1_SWP1.2@56.1,11.7 56.224,11.824 56.224,12.424 v1(56.25,12.45)
NetR6-1_SWP2_2: R6-1_SWP2.2 SWP1_SWP2.4 | length 1.5
  Top Layer w0.3: v1(65.5,12.45) 65.5,12.945 65.639,13.084 SWP1_SWP2.4@65.64,13.084
  Bottom Layer w0.3: R6-1_SWP2.2@65.35,11.7 65.474,11.824 65.474,12.424 v1(65.5,12.45)
NetR6-1_SWP3_2: R6-1_SWP3.2 SWP1_SWP3.4 | length 1.5
  Top Layer w0.3: v1(74.75,12.45) 74.75,12.945 SWP1_SWP3.4@74.89,13.084 SWP1_SWP3.4@74.89,13.084
  Bottom Layer w0.3: R6-1_SWP3.2@74.6,11.7 74.724,11.824 74.724,12.424 v1(74.75,12.45)
NetR6-1_SWP4_2: R6-1_SWP4.2 SWP1_SWP4.4 | length 1.5
  Top Layer w0.3: v1(84,12.45) 84,12.945 84.139,13.084 SWP1_SWP4.4@84.14,13.084
  Bottom Layer w0.3: R6-1_SWP4.2@83.85,11.7 83.974,11.824 83.974,12.424 v1(84,12.45)
NetR6-1_SWP5_2: R6-1_SWP5.2 SWP1_SWP5.4 | length 1.5
  Top Layer w0.3: v1(93.25,12.45) 93.25,12.945 93.389,13.084 SWP1_SWP5.4@93.39,13.084
  Bottom Layer w0.3: R6-1_SWP5.2@93.1,11.7 93.224,11.824 93.224,12.424 v1(93.25,12.45)
NetR6-1_SWP6_2: R6-1_SWP6.2 SWP1_SWP6.4 | length 1.5
  Top Layer w0.3: v1(102.5,12.45) 102.5,12.945 SWP1_SWP6.4@102.64,13.084 SWP1_SWP6.4@102.64,13.084
  Bottom Layer w0.3: R6-1_SWP6.2@102.35,11.7 102.474,11.824 102.474,12.424 v1(102.5,12.45)
NetR6-1_SWP7_2: R6-1_SWP7.2 SWP1_SWP7.4 | length 1.5
  Top Layer w0.3: v1(111.75,12.45) 111.75,12.945 SWP1_SWP7.4@111.89,13.084 SWP1_SWP7.4@111.89,13.084
  Bottom Layer w0.3: R6-1_SWP7.2@111.6,11.7 111.724,11.824 111.724,12.424 v1(111.75,12.45)
NetRFF-1_4: RFF-1.4 RFS-1.1 | length 2.3
  Top Layer w1.2: RFF-1.4@14.1,89.6 16.4,89.6
NetRFF-2_4: RFF-2.4 RFS-2.1 | length 2.4
  Top Layer w1.2: RFF-2.4@14.1,74.5 16.5,74.5
NetRFF-3_4: RFF-3.4 RFS-3.1 | length 2.3
  Top Layer w1.2: RFF-3.4@14.1,59.4 16.4,59.4
NetRFS-2_3: RFS-2.3 RFS-4.1 | length 2.7
  Top Layer w0.5: RFS-2.3@18.5,75.05 RFS-4.1@21.2,75.3
RF1_Mag: ADC1.1 RF_Mag_1.6 RF_Mag_1.7 | length 8.6
  Top Layer w0.3: RF_Mag_1.6@27.9,92.475 RF_Mag_1.7@27.9,93.125 35.725,93.125 ADC1.1@35.8,93.2
RF1A: C3-17.1 R2-5.1 RFS-1.2 | length 12.4
  Top Layer w0.5: RFS-1.2@18.5,89.075 19.325,89.075 20.05,88.35
  Top Layer w0.6: R2-5.1@27.4,82.8 C3-17.1@28.8,82.8
  Top Layer w1.2: 20.05,88.35 25.5,82.9 R2-5.1@26.9,82.9
RF1B: C3-3.1 R2-1.1 RFS-1.3 | length 5.5
  Top Layer w0.4: RFS-1.3@18.5,90.125 18.55,90.175 18.949,90.175
  Top Layer w0.6: 18.949,90.175 19.4,90.626 19.4,91.8 19.751,92.151 20.651,92.151 R2-1.1@20.8,92.3 20.85,92.3 21,92.45 21,93.65 21.1,93.75 C3-3.1@21.1,93.8
RF2_Mag: ADC1.4 R9-1.1 RF_Mag_2.6 RF_Mag_2.7 | length 77.2
  Top Layer w0.2: RF_Mag_2.7@20.625,63.5 20.625,62.575 22.3,60.9 25.1,60.9 28.726,64.526 28.726,65.126 v1(28.8,65.2) ; R9-1.1@50.3,89.8 50.65,89.45 50.65,79.317 50.767,79.2 51,79.2 v1(51.2,79)
  Top Layer w0.254: RF_Mag_2.6@19.975,63.5 RF_Mag_2.7@20.625,63.5
  Top Layer w0.3: ADC1.4@37.75,93.2 37.75,88.55 38.9,87.4 41.4,87.4 45.7,83.1 45.7,69.4 v1(45,68.7)
  Bottom Layer w0.2: v1(45.3,78.4) 45.9,79 v1(51.2,79)
  Bottom Layer w0.3: v1(28.8,65.2) 41.5,65.2 v1(45,68.7)
RF2A: C3-6.1 R2-2.1 RFS-2.2 | length 5.5
  Top Layer w0.5: RFS-2.2@18.5,74 19.5,74 21,72.5
  Top Layer w0.6: 21,72.5 21,71.5 R2-2.1@21.1,71.4 C3-6.1@21.1,70.2
RF2B: C3-23.1 R2-7.1 RFS-4.2 | length 13.8
  Top Layer w0.4: RFS-4.2@22.8,74.775 23.525,74.775 24.5,73.8 24.6,73.8
  Top Layer w0.5: R2-7.1@31.7,68 31.85,67.85 33.7,67.85 C3-23.1@33.7,67.8
  Top Layer w1.2: 24.6,73.8 30.4,68 R2-7.1@31.7,68
RF2C: C3-20.1 R2-6.2 RFS-4.3 | length 6.3
  Top Layer w0.4: RFS-4.3@22.8,75.825 23.925,75.825 24.2,76.1
  Top Layer w0.6: R2-6.2@27.4,78.2 C3-20.1@28.8,78.2
  Top Layer w1.2: 24.2,76.1 26.1,78 26.8,78
RF3_Mag: ADC1.7 RF_Mag_3.6 RF_Mag_3.7 | length 73.1
  Top Layer w0.2: RF_Mag_3.6@23.3,49.7 23.625,49.7 ; RF_Mag_3.7@23.95,49.7 23.625,49.7 ; ADC1.7@39.7,93.2 39.7,89.9 40.5,89.1 43.3,89.1 47.6,84.8 47.6,72.6 50.9,69.3 50.9,64.2 46.7,60 41.7,60 34.8,53.1 34.8,48.6 25.8,48.6 25.7,48.7 24.1,48.7 23.625,49.175 23.625,49.7
RF3A: C3-9.1 R2-3.1 RFS-3.2 | length 6.6
  Top Layer w0.5: RFS-3.2@18.5,58.9 19,58.9 R2-3.1@20.4,57.5
  Top Layer w0.6: R2-3.1@20.4,57.5 20.4,57.45 20.55,57.3 20.6,57.3 23.4,57.3 C3-9.1@24.1,56.6
RF3B: C3-26.1 R2-8.2 RFS-3.3 | length 17.2
  Top Layer w0.5: RFS-3.3@18.5,59.95 20.55,59.95 21,59.5 23.5,59.5 23.7,59.3 ; R2-8.2@31.7,62.6 31.7,62.75 32.15,63.2 C3-26.1@33.7,63.2
  Top Layer w1.2: 23.7,59.3 28.4,59.3 R2-8.2@31.7,62.6
RF4: C3-12.1 R2-4.1 RFF-4.4 | length 5.2
  Top Layer w0.3: R2-4.1@17.6,43.2 17.7,43.1 C3-12.1@18.8,43.1
  Top Layer w1.2: RFF-4.4@14.1,44.2 16.6,44.2 R2-4.1@17.6,43.2
RF4_Mag: ADC1.8 RF_Mag_4.6 RF_Mag_4.7 | length 74.3
  Top Layer w0.2: RF_Mag_4.6@25.725,42.075 RF_Mag_4.7@25.725,42.725 26.825,42.725 27.3,43.2 27.6,43.2 28.7,44.3 28.7,46.1 30.7,48.1 35.383,48.1 35.5,48.217 35.5,52.9 41.8,59.2 46.7,59.2 51.5,64 51.5,69.8 48.2,73.1 48.2,85 43.6,89.6 41.2,89.6 40.35,90.45 ADC1.8@40.35,93.2
RF12_Mag: ADC1.2 J1-1.3 R4-1.1 | length 48.2
  Top Layer w0.2: v1(41.4,83.8) 41.5,83.8 41.8,84.1 ; v1(53.4,80.9) 53.3,81 53.3,90.7 53.8,91.2 55.05,91.2 56.1,92.25 56.1,96.48 J1-1.3@54.8,97.78
  Top Layer w0.3: ADC1.2@36.45,93.2 36.45,87.95 38.3,86.1 39.8,86.1 41.8,84.1 43,82.9 R4-1.1@43,81.9
  Bottom Layer w0.2: v1(41.4,83.8) 41.333,83.733 41.333,83.567 43.3,81.6 52.7,81.6 v1(53.4,80.9)
RF12_Ph: ADC1.3 J1-2.1 R4-2.1 | length 47.8
  Top Layer w0.2: 43.8,78.7 43.8,78.2 v1(44.3,77.7) ; v1(53.2,78.3) 56.7,81.8 56.7,90.2 58.9,92.4 J1-2.1@58.9,92.7
  Top Layer w0.3: ADC1.3@37.1,93.2 37.1,88.2 38.5,86.8 40.6,86.8 44.9,82.5 44.9,79.5 44.1,78.7 43.8,78.7 R4-2.1@43,78.7
  Bottom Layer w0.2: v1(44.3,77.7) 44.7,77.3 45.6,77.3 46.3,78 48,78 48.3,78.3 v1(53.2,78.3)
RF23_Mag: ADC1.5 J1-1.1 R4-4.1 | length 57.8
  Top Layer w0.2: ADC1.5@38.4,93.2 38.4,89.6 39.9,88.1 41.8,88.1 46.4,83.5 46.4,71.9 47.7,70.6 v1(47.7,69.9) R4-4.1@47.7,66.9 ; v1(51.2,72.6) 52.3,73.7 52.3,88.3 52.8,88.8 52.8,91.2 54.051,92.451 54.551,92.451 J1-1.1@54.8,92.7
  Bottom Layer w0.2: v1(47.7,69.9) 48.5,69.9 v1(51.2,72.6)
RF23_Ph: ADC1.6 J1-2.3 R4-6.1 | length 75.3
  Top Layer w0.2: ADC1.6@39.05,93.2 39.05,89.85 40.3,88.6 42.8,88.6 47,84.4 47,72.1 50.3,68.8 50.3,68.3 50.3,68.2 50.3,64.7 49.4,63.8 47.8,63.8 R4-6.1@47.7,63.9 ; v1(49.8,67.6) 50.3,68.1 ; v1(53,70.3) 53,76.8 57.4,81.2 57.4,90.2 58.4,91.2 59.7,91.2 61.3,92.8 61.3,95.38 J1-2.3@58.9,97.78
  Bottom Layer w0.2: v1(49.8,67.6) 50.3,67.6 v1(53,70.3)
RF_Enable: LL-2.1 PWM1.6 R1-2.2 RF_Mag_1.16 RF_Mag_2.16 RF_Mag_3.16 | length 215.4
  Top Layer w0.2: v1(18.7,55.2) 19,54.9 21.2,54.9 22.2,53.9 RF_Mag_3.16@22.65,53.9 ; v1(22.2,67.3) 22.8,67.3 23.7,68.2 25.1,68.2 26.5,66.8 26.5,66.4 v1(27.5,65.4) ; RF_Mag_1.16@23.7,91.825 23.725,91.825 23.8,91.75 v1(23.8,90.8) ; v1(27.1,55.8) 32.7,55.8 39.4,62.5 v1(39.4,64.2) ; v1(27.5,90.9) 28.7,89.7 28.7,88.5 29.3,87.9 33,87.9 34.9,86 34.9,84 35.6,83.3 35.6,81.1 36.5,80.2 36.5,75.4 ; v1(41.6,64.1) 41.6,67.4 41.3,67.7 40.6,67.7 39.5,68.8 39.5,72.4 36.5,75.4 ; v1(44.6,76.3) 43.7,75.4 36.5,75.4 ; v1(67.4,78.2) 67.8,78.6 67.8,116.2 v1(69.9,118.3) ; v1(79.2,118.2) 81.9,118.2 82.2,117.9 87.7,117.9 90.4,120.6 92.2,120.6 93.2,121.6 v1(93.2,124) 93.2,124.1 92.425,124.875 91.475,124.875 PWM1.6@91.4,124.95 ; v1(97.9,129.2) 97.9,135.113 LL-2.1@98.6,135.813
  Top Layer w0.3: R1-2.2@17.5,68.8 17.774,68.526 17.774,68.226 17.801,68.199 17.95,68.05 19.3,68.05 19.325,68.025 RF_Mag_2.16@19.325,67.7
  Bottom Layer w0.2: v1(18.7,55.2) 20.2,55.2 20.9,54.5 25.6,54.5 26.9,55.8 v1(27.1,55.8) ; v1(19.1,67.3) v1(22.2,67.3) ; v1(23.8,90.8) 23.9,90.9 v1(27.5,90.9) ; v1(27.5,65.4) 27.5,65.3 28.3,64.5 36.7,64.5 36.9,64.7 38.9,64.7 v1(39.4,64.2) 41.5,64.2 v1(41.6,64.1) ; v1(44.6,76.3) 54,76.3 v1(54.2,76.5) 59,76.5 60.4,77.9 67.083,77.9 67.383,78.2 v1(67.4,78.2) ; v1(69.9,118.3) 70,118.2 70,118 78.892,118 79.092,118.2 v1(79.2,118.2) ; v1(93.2,124) 93.2,124.5 v1(97.9,129.2)
RF_Enable2: PWM1.7 RF_Mag_4.16 | length 148
  Top Layer w0.2: RF_Mag_4.16@21.525,41.425 21.525,40.325 20.3,39.1 20.3,36.8 20.5,36.6 30.3,36.6 34.2,40.5 34.2,43.6 v1(34.6,44) ; v1(40.9,46.5) 40.823,46.577 40.823,46.794 40.8,46.817 40.8,48.2 53.6,61 53.6,64.9 63.9,75.2 66.3,75.2 68.3,77.2 68.3,112.9 69.6,114.2 v1(69.6,116.8) ; v1(81.1,117.3) 87.8,117.3 90.6,120.1 92.4,120.1 94.3,122 94.3,124.1 92.8,125.6 PWM1.7@91.4,125.6
  Bottom Layer w0.2: v1(34.6,44) 38.4,44 v1(40.9,46.5) ; v1(69.6,116.8) 70.3,117.5 80.792,117.5 80.992,117.3 v1(81.1,117.3)
RFA: LR-1.5 Opa1-1.1 R9-2.2 | length 74.2
  Top Layer w0.254: LR-1.5@5.2,120.94 6.655,120.94 6.998,120.597 6.998,105.452 8.8,103.65 v1(47.7,103.65) ; v1(49.5,91.55) 50.05,91.55 R9-2.2@50.3,91.3
  Top Layer w0.3: R9-2.2@50.3,91.3 50.3,92.249 50.476,92.425 50.625,92.425 50.7,92.5 Opa1-1.1@50.7,93
  Bottom Layer w0.254: v1(47.7,103.65) 49.5,101.85 v1(49.5,91.55)
RFB: LR-2.5 Opa1-1.6 Opa1-1.7 | length 47.6
  Top Layer w0.3: LR-2.5@25,120.92 26.57,119.35 27.224,119.35 27.4,119.174 27.4,105.776 27.976,105.2 49.8,105.2 v1(50.8,104.2) ; Opa1-1.7@51.35,97.4 Opa1-1.6@52,97.4
  Bottom Layer w0.3: v1(50.8,104.2) 51.683,103.317 v1(51.683,98.22)
RFC: LR-3.5 Opa1-2.1 Opa1-2.2 | length 46.8
  Top Layer w0.254: LR-3.5@39.68,120.94 40.92,119.7 42.95,119.7 43.75,118.9 43.75,106.549 44.099,106.2 54.6,106.2 v1(56.8,104) ; 54.6,89.925 54.725,89.925 56.8,92 v1(56.8,98.05)
  Top Layer w0.3: Opa1-2.2@54.6,89.6 54.6,89.925
  Bottom Layer w0.254: v1(56.8,98.05) v1(56.8,104)
RFSwitch: Buf1.2 Iso-2.11 | length 161.7
  Top Layer w0.2: Iso-2.11@22.61,157.2 22.61,158.51 23.1,159 45.5,159 50.8,153.7 68.6,153.7 v1(76.1,146.2) ; v1(109,114) 109.2,113.8 109.2,90.7 108,89.5 108,87.067 108.117,86.95 Buf1.2@109.387,86.95 ; v1(109.2,119.3) 109.2,124.4 114,129.2 v1(114,146.4)
  Bottom Layer w0.2: v1(76.1,146.2) 76.3,146.4 v1(114,146.4) ; v1(109,114) 109,119.1 v1(109.2,119.3)
RH: ADC2.21 C8-14.1 R12-12.2 | length 5.6
  Top Layer w0.2: R12-12.2@64.3,64.45 64.5,64.65 ADC2.21@69.8,64.65
RH_Con: CLC-11.2 Con_S.10 | length 10
  Top Layer w0.2: Con_S.10@34.6,7.6 34.6,9.95 35.6,10.95 37.75,10.95 39.625,12.825 40.633,12.825 40.75,12.942 40.75,12.975 40.85,13.075 CLC-11.2@40.95,13.075
ROut1: R4-3.1 R5-1.2 | length 20.5
  Top Layer w0.2: R5-1.2@42.6,92 42.933,91.667 42.933,91.367 49.1,85.2 v1(49.1,80.3) ; R4-3.1@43,80.3 43.7,80.3 v1(43.9,80.3)
  Bottom Layer w0.2: v1(43.9,80.3) v1(49.1,80.3)
ROut2: R4-5.1 R6-1.2 | length 33.7
  Top Layer w0.2: R6-1.2@44.1,92 44.15,92 44.5,91.65 44.5,91.6 50,86.1 50,72.2 52.4,69.8 v1(52.4,67.7) ; R4-5.1@47.7,65.4 v1(49.1,65.4)
  Bottom Layer w0.2: v1(49.1,65.4) 50.5,65.4 52.376,67.276 52.376,67.676 v1(52.4,67.7)
RTD_Air_D1: CF-11.1 Con_S.12 | length 19.2
  Top Layer w0.2: Con_S.12@34.1,7.6 34.1,6.317 34.217,6.2 34.583,6.2 34.68,6.103 35.072,6.103 v1@35.1,6.075 ; v1(36.45,12.75) 36.85,13.15 36.85,14.95 38.2,16.3 38.2,20.425 37.9,20.725 CF-11.1@37.9,21.275
  Bottom Layer w0.2: v1@35.1,6.075 35.1,6.183 34.9,6.383 34.9,10.35 36.326,11.776 36.326,12.433 36.373,12.481 36.373,12.673 v1(36.45,12.75)
  other v1: 35.1,6.05
RTD_Air_D2: CF-10.1 Con_S.14 | length 22.5
  Top Layer w0.2: Con_S.14@33.6,7.6 33.6,6.1 33.9,5.8 34.3,5.8 34.774,5.326 35.476,5.326 v1@35.5,5.35 ; v1(39.55,14.85) 39.55,14.958 39.75,15.158 39.75,20.2 40.442,20.892 40.442,21.175 40.542,21.275 CF-10.1@40.55,21.275
  Bottom Layer w0.2: v1@35.5,5.35 36.445,5.35 37.075,5.98 37.075,6.85 38.5,8.275 38.5,14.1 39.176,14.776 39.476,14.776 v1(39.55,14.85)
  other v1: 35.5,5.275
RTD_Air_S1: CF-7.1 Con_S.16 | length 9.3
  Top Layer w0.2: CF-7.1@31.458,10.667 CF-7.1@31.45,10.675 31.35,10.675 31.25,10.575 31.25,10.475 30.55,9.775 30.55,6.6 31.45,5.7 32.983,5.7 33.1,5.817 Con_S.16@33.1,7.6
RTD_Air_S2: CF-14.1 Con_S.18 | length 20
  Top Layer w0.2: Con_S.18@32.6,7.6 32.6,6.267 32.483,6.15 31.7,6.15 31.075,6.775 31.075,9.025 33.4,11.35 34.15,11.35 34.9,12.1 34.9,12.8 35.8,13.7 35.8,15.2 37.4,16.8 37.4,19.483 37.283,19.6 36.6,19.6 36.5,19.7 CF-14.1@36.5,19.8
RTD_D1_Con: CF-9.1 Con_S.17 | length 29.4
  Top Layer w0.2: v1(32.325,2.05) 32.325,2.077 32.6,2.352 Con_S.17@32.6,3.6 ; v1(35.55,12.45) 35.599,12.499 35.599,12.849 36.2,13.45 36.2,15 37.8,16.6 37.8,20.1 35.658,22.242 35.658,22.525 35.558,22.625 CF-9.1@35.55,22.625
  Bottom Layer w0.2: v1(32.325,2.05) 32.402,1.973 32.652,1.973 33.275,1.35 34.5,1.35 34.8,1.65 34.8,2.8 33.25,4.35 33.25,5.575 33.725,6.05 33.725,8.825 33.25,9.3 33.25,9.9 35.473,12.123 35.473,12.373 v1(35.55,12.45)
RTD_D2_Con: CF-8.1 Con_S.11 | length 26.5
  Top Layer w0.2: v1(33.993,5.139) 33.993,5.031 34.075,4.949 34.075,3.625 Con_S.11@34.1,3.6 ; v1(39.216,13.792) 38.85,14.158 38.85,15.2 39.3,15.65 CF-8.1@39.3,21.275
  Bottom Layer w0.2: v1(33.993,5.139) 33.993,5.031 34.135,4.889 34.135,4.832 34.22,4.747 ; 34.22,4.746 35.466,3.5 38.5,3.5 40.675,5.675 40.675,7.425 39.216,8.884 v1(39.216,13.792)
RTD_Polarity: PWM1.19 R1-16.2 Sw1.1 Sw1.5 | length 115.8
  Top Layer w0.2: v1(43.1,42.25) 43.36,42.51 43.36,43.16 Sw1.5@43.4,43.2 ; v1(45.7,42.1) 45.623,42.177 45.623,42.394 45.467,42.55 45.44,42.55 45.4,42.59 Sw1.1@45.4,43.2 45.4,43.483 45.44,43.523 45.723,43.523 46.217,44.017 46.667,44.017 R1-16.2@46.9,44.25 46.9,51.2 55.6,59.9 55.6,63.9 58.9,67.2 60.1,67.2 68.8,75.9 68.8,110.9 69.4,111.5 69.4,112.8 70.4,113.8 70.4,116.9 72.7,119.2 72.7,128.192 72.5,128.392 v1(72.5,128.5) ; v1(78.35,128.55) 79.4,127.5 84.95,127.5 PWM1.19@85,127.55
  Bottom Layer w0.2: v1(43.1,42.25) 45.55,42.25 v1(45.7,42.1) ; v1(72.5,128.5) 78.3,128.5 v1(78.35,128.55)
RTD_S1_Con: CF-13.1 Con_S.15 | length 16.7
  Top Layer w0.2: v1@29.6,8.925 29.6,8.992 29.85,9.242 CF-13.1@29.85,10.675 ; v1@32.275,1.075 32.625,1.075 33.1,1.55 Con_S.15@33.1,3.6
  Bottom Layer w0.2: v1@29.6,8.925 29.8,9.125 32.125,9.125 32.85,8.4 32.85,6.55 32.175,5.875 32.175,3.55 31.625,3 31.625,1.725 v1@32.275,1.075
  other v1: 32.275,1.15 29.6,8.9
RTD_S2_Con: CF-12.1 Con_S.13 | length 18.9
  Top Layer w0.2: Con_S.13@33.6,3.6 33.6,2.358 33.725,2.233 v1@33.725,2.125 ; v1(34.15,12.3) 34.199,12.349 34.199,12.699 35.4,13.9 35.4,16.175 CF-12.1@36.2,16.975
  Bottom Layer w0.2: v1@33.725,2.125 33.676,2.174 33.326,2.174 32.725,2.775 32.725,5.75 33.275,6.3 33.275,8.575 32.725,9.125 32.725,9.975 34.15,11.4 v1(34.15,12.3)
  other v1: 33.75,2.075
RTDI: ADC2.20 Sw1.2 Sw1.7 | length 48.6
  Top Layer w0.2: Sw1.7@43.9,38 43.9,39.8 44.9,40.8 Sw1.2@44.9,43.2 44.9,50.1 55.1,60.3 55.1,64.4 58.5,67.8 58.8,67.8 v1(59.2,68.2) ; v1(64.2,66.1) 64.6,65.7 67.4,65.7 67.95,65.15 ADC2.20@69.8,65.15
  Bottom Layer w0.2: v1(59.2,68.2) 62.1,68.2 v1(64.2,66.1)
SCK: ADC2.11 Iso-2.14 | length 130.2
  Top Layer w0.2: Iso-2.14@26.42,157.2 26.42,152.28 29.15,149.55 65.7,149.55 73.65,141.6 ADC2.11@73.65,68
SCK0: H1.18 Iso-2.3 | length 6.8
  Top Layer w0.3: H1.18@25.08,172.96 25.08,171.72 26.42,170.38 Iso-2.3@26.42,166.7
SCL: ADC1.14 Iso-1.11 PWM1.26 R13-1.1 | length 133.8
  Top Layer w0.2: R13-1.1@36.05,152.53 v1(36.05,154.2) 36.38,154.53 Iso-1.11@36.38,157.2 ; v1(36.3,147.1) 36.75,147.55 60.95,147.55 65.35,143.15 v1(65.35,123.55) 65.35,103.95 63.4,102 37.85,102 37.1,101.25 ADC1.14@37.1,99 ; v1(82,123.4) 83.1,123.4 83.5,123 PWM1.26@85,123
  Bottom Layer w0.2: v1(36.05,154.2) 36.05,147.417 36.3,147.167 v1(36.3,147.1) ; v1(65.35,123.55) 65.5,123.4 v1(82,123.4)
SCL0: H1.11 Iso-1.6 | length 11.3
  Top Layer w0.3: v1(36.3,170.1) 36.3,168.119 36.2,168.019 36.2,167.726 36.23,167.696 36.23,166.85 Iso-1.6@36.38,166.7
  Bottom Layer w0.3: v1(36.3,170.1) 37.2,171 40.9,171 H1.11@42.86,172.96
SDA: ADC1.15 Iso-1.12 PWM1.27 R13-2.2 | length 130.9
  Top Layer w0.2: ADC1.15@36.45,99 36.45,101.6 37.35,102.5 61.9,102.5 63.6,104.2 63.6,122.45 63.6,141.65 59.15,146.1 v1(37.9,146.1) ; Iso-1.12@37.65,157.2 37.65,155.05 v1(38.15,154.55) 38.15,152.57 R13-2.2@38.32,152.4 ; v1(82,122.35) PWM1.27@85,122.35
  Bottom Layer w0.2: v1(37.9,146.1) 37.9,146.167 38.15,146.417 v1(38.15,154.55) ; v1(63.55,122.45) 63.65,122.35 v1(82,122.35)
SDA0: H1.13 Iso-1.5 | length 6.3
  Top Layer w0.3: Iso-1.5@37.65,166.7 37.65,172.83 H1.13@37.78,172.96
SensorsEnable: LL-4.1 Mux1.18 Mux2.18 PWM1.18 R1-14.1 VReg-6.5 VReg-7.5 | length 250.9
  Top Layer w0.2: Mux2.18@25.4,15 25.4,13.6 v1(25.6,13.4) ; Mux1.18@25.45,25.15 25.45,23.708 25.6,23.558 v1@25.6,23.45 ; v1(27.6,35.8) 30.3,35.8 31.4,36.9 33.7,36.9 38.117,41.317 38.117,41.483 38.077,41.523 38.077,41.723 v1(38,41.8) ; R1-14.1@37.35,32.5 37.35,34.65 39.1,36.4 39.7,36.4 41.2,37.9 41.2,42.5 v1(40.8,42.9) 40.8,44.5 40.2,45.1 40.2,48.2 53.2,61.2 53.2,65.1 67.4,79.3 67.4,118.592 68.2,119.392 v1(68.2,119.5) ; VReg-7.5@59.329,125.734 59.329,119.579 59.5,119.408 v1(59.5,119.3) ; v1(77.5,118.8) 77.1,118.4 77.1,112.5 v1(77.7,111.9) ; PWM1.18@85,128.2 86.7,128.2 86.9,128 v1(87.4,128) 87.4,127.892 87.6,127.692 87.6,120.6 87.377,120.377 87.377,118.777 v1(87.3,118.7) ; v1(89.65,133.35) 89.6,133.4 89.6,137.55 98.6,146.55 LL-4.1@98.6,152.875 ; VReg-6.5@96.384,112.384 v1(96.4,112.4)
  Bottom Layer w0.2: v1(25.5,23.55) 25.451,23.599 25.451,24.349 24.4,25.4 24.4,26.2 24.1,26.5 24.1,34 25,34.9 26.7,34.9 v1(27.6,35.8) ; v1(25.6,13.4) 25.6,16.45 23.5,18.55 23.5,21.15 24.85,22.5 25.05,22.5 25.6,23.05 v1@25.6,23.45 ; v1(38,41.8) 38.5,42.3 40.5,42.3 40.726,42.526 40.726,42.826 v1(40.8,42.9) ; v1(59.5,119.3) 59.608,119.3 59.808,119.5 70.9,119.5 71.6,118.8 v1(77.5,118.8) 77.577,118.877 77.794,118.877 77.817,118.9 86.992,118.9 87.192,118.7 v1(87.3,118.7) ; v1(77.7,111.9) 95.9,111.9 v1(96.4,112.4) ; v1(87.4,128) 88.8,129.4 88.8,132.5 v1(89.65,133.35)
SWEN1: LL-1_SWP1.1 PWM1.8 SWP1_SWP1.1 | length 160.2
  Top Layer w0.2: PWM1.8@91.4,126.25 93.15,126.25 99,120.4 v1(99,119) ; v1(103.25,49.55) 103.95,50.25 103.95,109.75 v1(103.6,110.1)
  Top Layer w0.3: SWP1_SWP1.1@56.39,16.894 56.39,18.18 LL-1_SWP1.1@58.46,20.25
  Bottom Layer w0.2: LL-1_SWP1.1@58.46,20.25 58.46,25.06 59.3,25.9 75.7,25.9 76.55,26.75 93.85,26.75 94.2,27.1 102.45,27.1 103,27.65 103,49.233 103.25,49.483 v1(103.25,49.55) ; v1(99,119) 99.024,118.976 99.024,118.576 101.2,116.4 101.2,111.9 103,110.1 v1(103.6,110.1)
SWEN2: LL-1_SWP2.1 PWM1.9 SWP1_SWP2.1 | length 152.7
  Top Layer w0.2: PWM1.9@91.4,126.9 93.3,126.9 100.2,120 v1(100.2,119) ; v1(103.2,111.5) 103.3,111.5 104.45,110.35 104.45,49.5 v1(103.65,48.7)
  Top Layer w0.3: SWP1_SWP2.1@65.64,16.894 65.64,18.18 LL-1_SWP2.1@67.71,20.25
  Bottom Layer w0.2: LL-1_SWP2.1@67.71,20.25 67.71,25.36 67.85,25.5 76,25.5 76.8,26.3 94.1,26.3 94.5,26.7 103.25,26.7 103.4,26.85 103.4,48.383 103.65,48.633 v1(103.65,48.7) ; v1(100.2,119) 100.2,118.7 102,116.9 102,112.7 v1(103.2,111.5)
SWEN3: LL-1_SWP3.1 PWM1.10 SWP1_SWP3.1 | length 145
  Top Layer w0.2: PWM1.10@91.4,127.55 93.55,127.55 101.326,119.774 101.326,119.174 v1(101.4,119.1) ; v1(103.1,112.7) 103.1,112.55 104.95,110.7 104.95,48.6 v1(104.2,47.85)
  Top Layer w0.3: SWP1_SWP3.1@74.89,16.894 74.89,18.18 LL-1_SWP3.1@76.96,20.25
  Bottom Layer w0.2: LL-1_SWP3.1@76.96,20.25 76.96,25.46 77.35,25.85 94.5,25.85 94.9,26.25 103.45,26.25 103.85,26.65 103.85,47.5 v1(104.2,47.85) ; v1(101.4,119.1) 101.4,118.9 102.7,117.6 102.7,113.1 v1(103.1,112.7)
SWEN4: LL-1_SWP4.1 PWM1.11 SWP1_SWP4.1 | length 137.1
  Top Layer w0.2: PWM1.11@91.4,128.2 93.8,128.2 102.426,119.574 102.426,119.274 v1(102.5,119.2) ; v1(103.6,114.3) 103.6,113.3 104.8,112.1 104.8,111.65 105.4,111.05 105.4,47.55 v1(104.85,47)
  Top Layer w0.3: SWP1_SWP4.1@84.14,16.894 84.14,18.18 LL-1_SWP4.1@86.21,20.25
  Bottom Layer w0.2: LL-1_SWP4.1@86.21,20.25 86.21,24.96 86.65,25.4 95.3,25.4 95.7,25.8 103.65,25.8 104.25,26.4 104.25,46.4 v1(104.85,47) ; v1(102.5,119.2) 102.6,119.2 103.6,118.2 v1(103.6,114.3)
SWEN5: LL-1_SWP5.1 PWM1.12 SWP1_SWP5.1 | length 129.1
  Top Layer w0.2: PWM1.12@91.4,128.85 94.05,128.85 v1(103.7,119.2) ; v1(104.5,114.2) 104.5,113.5 105.5,112.5 105.5,111.8 105.9,111.4 105.9,46.45 v1(105.55,46.1)
  Top Layer w0.3: SWP1_SWP5.1@93.39,16.894 93.39,18.18 LL-1_SWP5.1@95.46,20.25
  Bottom Layer w0.2: LL-1_SWP5.1@95.46,20.25 95.46,24.56 96.2,25.3 103.8,25.3 104.65,26.15 104.65,45.2 v1(105.55,46.1) ; v1(103.7,119.2) 104.5,118.4 v1(104.5,114.2)
SWEN6: LL-1_SWP6.1 PWM1.13 SWP1_SWP6.1 | length 122.2
  Top Layer w0.2: PWM1.13@91.4,129.5 94.4,129.5 v1(104.7,119.2) ; v1(105.7,113.4) 106.1,113 106.1,111.8 106.3,111.6 106.3,45.458 106.068,45.227 105.827,45.227 v1(105.75,45.15)
  Top Layer w0.3: SWP1_SWP6.1@102.64,16.894 102.64,18.18 LL-1_SWP6.1@104.71,20.25
  Bottom Layer w0.2: v1(104.7,119.2) 104.7,119 105.2,118.5 105.2,113.9 v1(105.7,113.4) ; LL-1_SWP6.1@104.71,20.25 104.71,24.81 105.05,25.15 105.05,44.45 v1(105.75,45.15)
SWEN7: LL-1_SWP7.1 PWM1.15 SWP1_SWP7.1 | length 134.9
  Top Layer w0.2: PWM1.15@85,130.15 89.05,130.15 89.75,130.85 94.25,130.85 v1(105.7,119.4) ; v1(106,114.2) 106.5,113.7 106.5,112.1 106.7,111.9 106.7,44.467 106.4,44.167 v1(106.4,44.15)
  Top Layer w0.3: SWP1_SWP7.1@111.89,16.894 111.89,18.18 LL-1_SWP7.1@113.96,20.25
  Bottom Layer w0.2: v1(105.7,119.4) 106,119.1 v1(106,114.2) ; v1(106.4,44.15) 105.55,43.3 105.55,26.25 106.3,25.5 108.4,25.5
  Bottom Layer w0.3: 108.4,25.5 113.327,20.573 113.367,20.573 113.689,20.25 LL-1_SWP7.1@113.96,20.25
T_RH: ADC2.22 C8-13.1 R12-11.2 | length 10.3
  Top Layer w0.2: C8-13.1@61.8,60.95 62,61.15 62,62.8 62.35,63.15 62.55,63.15 62.6,63.2 67,63.2 67.95,64.15 ADC2.22@69.8,64.15
T_RH_Con: CLC-10.2 Con_S.8 | length 11.3
  Top Layer w0.2: Con_S.8@35.1,7.6 35.1,9.85 35.7,10.45 38.1,10.45 39.7,12.05 42,12.05 42.419,12.469 CLC-10.2@42.419,13.075
VDivHigh: J1-3.2 LR-4.6 LR-5.6 | length 53.1
  Top Layer w0.254: v1(35.25,139.5) 35.281,139.469 35.281,138.819 36.133,137.967 36.533,137.967 37.05,137.45 ; J1-3.2@35.65,127.3 37.05,128.7 37.05,129.45 36.85,129.65 36.85,137.25 37.05,137.45 ; LR-5.6@43.2,141.72 43.2,137.899 42.951,137.65 37.25,137.65 37.05,137.45
  Bottom Layer w0.254: LR-4.6@9.86,134.12 10.9,135.16 11.05,135.31 11.05,137.7 12.85,139.5 v1(35.25,139.5) ; LR-5.6@43.22,141.7 LR-5.6@43.24,141.72
VL_SWP1: D1_SWP1.2 HP-1_SWP1.2 SWP1_SWP1.0 | length 7.9
  Bottom Layer w1: SWP1_SWP1.0@59.311,14.1 59.311,13.389 61,11.7 61,11.15 D1_SWP1.2@61.25,10.9 61.45,10.7 HP-1_SWP1.2@61.45,7.05
VL_SWP2: D1_SWP2.2 HP-1_SWP2.2 SWP1_SWP2.0 | length 7.9
  Bottom Layer w1: SWP1_SWP2.0@68.561,14.1 68.561,13.389 70.25,11.7 70.25,11.15 D1_SWP2.2@70.5,10.9 70.7,10.7 HP-1_SWP2.2@70.7,7.05
VL_SWP3: D1_SWP3.2 HP-1_SWP3.2 SWP1_SWP3.0 | length 7.9
  Bottom Layer w1: SWP1_SWP3.0@77.811,14.1 77.811,13.389 79.5,11.7 79.5,11.15 D1_SWP3.2@79.75,10.9 79.95,10.7 HP-1_SWP3.2@79.95,7.05
VL_SWP4: D1_SWP4.2 HP-1_SWP4.2 SWP1_SWP4.0 | length 7.9
  Bottom Layer w1: SWP1_SWP4.0@87.061,14.1 87.061,13.389 88.75,11.7 88.75,11.15 D1_SWP4.2@89,10.9 89.2,10.7 HP-1_SWP4.2@89.2,7.05
VL_SWP5: D1_SWP5.2 HP-1_SWP5.2 SWP1_SWP5.0 | length 7.9
  Bottom Layer w1: SWP1_SWP5.0@96.311,14.1 96.311,13.389 98,11.7 98,11.15 D1_SWP5.2@98.25,10.9 98.45,10.7 HP-1_SWP5.2@98.45,7.05
VL_SWP6: D1_SWP6.2 HP-1_SWP6.2 SWP1_SWP6.0 | length 7.9
  Bottom Layer w1: SWP1_SWP6.0@105.561,14.1 105.561,13.389 107.25,11.7 107.25,11.15 D1_SWP6.2@107.5,10.9 107.7,10.7 HP-1_SWP6.2@107.7,7.05
VL_SWP7: D1_SWP7.2 HP-1_SWP7.2 SWP1_SWP7.0 | length 7.9
  Bottom Layer w1: SWP1_SWP7.0@114.811,14.1 114.811,13.389 116.5,11.7 116.5,11.15 D1_SWP7.2@116.75,10.9 116.95,10.7 HP-1_SWP7.2@116.95,7.05
VRTDN0: CLC-3.1 R12-3.1 | length 84.1
  Top Layer w0.2: CLC-3.1@39.5,35.35 41.7,37.55 41.7,48.4 54.1,60.8 54.1,64.8 62.3,73 v1(63.5,73) ; v1(78.4,74.35) 87.85,74.35 89.7,72.5 89.7,68.95 88.45,67.7 85.667,67.7 R12-3.1@85.55,67.817
  Bottom Layer w0.2: v1(63.5,73) 64.4,73.9 77.5,73.9 77.95,74.35 v1(78.4,74.35)
VRTDN1: CF-4_RP1.2 Mux1.11 | length 27.1
  Top Layer w0.2: CF-4_RP1.2@10.023,24.402 10.023,24.027 v1(10.1,23.95) ; v1(11.4,33.4) 11.6,33.6 24.8,33.6 25.45,32.95 Mux1.11@25.45,31.55
  Bottom Layer w0.2: v1(10.1,23.95) 10.1,25.6 9.75,25.95 9.9,26.1 9.9,32.85 10.45,33.4 v1(11.4,33.4)
VRTDN2: CF-4_RP2.2 Mux1.10 | length 41.3
  Top Layer w0.2: v1(9.15,34.3) 24.8,34.3 26.1,33 Mux1.10@26.1,31.55 ; CF-4_RP2.2@9.925,13.25 v1(10.55,13.25)
  Bottom Layer w0.2: v1(9.15,34.3) 9,34.15 9,24.8 9.4,24.4 9.4,14.4 v1(10.55,13.25)
VRTDN3: CF-4_RP3.2 Mux1.9 | length 49.5
  Top Layer w0.2: CF-4_RP3.2@10.1,9.775 11.573,9.775 v1(11.721,9.627) ; Mux1.9@26.75,31.55 26.75,29.75 28.044,28.456 31.594,28.456 33.65,26.4 33.65,24.25 34.05,23.85 34.05,15.1 34.35,14.8 34.35,14.1 32.5,12.25 v1(32.5,11.5)
  Bottom Layer w0.2: v1(11.721,9.627) 11.812,9.627 12.038,9.4 21.85,9.4 22.5,10.05 31.05,10.05 v1(32.5,11.5)
VRTDN4: CF-4_RP4.2 Mux1.8 | length 37.6
  Top Layer w0.2: CF-4_RP4.2@23,9.825 24.225,9.825 v1(24.85,9.2) ; Mux1.8@27.4,31.55 27.329,31.479 27.329,29.871 28.25,28.95 31.8,28.95 34.25,26.5 34.25,24.35 34.5,24.1 34.5,15.5 34.975,15.025 34.975,14.075 33.349,12.449 33.349,12.099 v1(33.3,12.05)
  Bottom Layer w0.2: v1(24.85,9.2) 24.867,9.2 25.242,9.575 31.575,9.575 33.3,11.3 v1(33.3,12.05)
VRTDN5: CF-4_RP5.2 Mux1.7 | length 11.1
  Top Layer w0.2: CF-4_RP5.2@20.925,24.5 20.925,24.6 21.025,24.7 21.244,24.7 23.344,26.8 v1(25,26.8) ; v1@28,30.1 28.025,30.125 28.025,31.525 Mux1.7@28.05,31.55
  Bottom Layer w0.2: v1(25,26.8) 25.05,26.8 27.951,29.701 27.951,30.051 v1@28,30.1
  other v1: 28,30.15
VRTDN6: CF-4_RP6.2 Mux1.6 | length 30.6
  Top Layer w0.2: CF-4_RP6.2@20.925,14.25 20.975,14.2 v1(21.3,14.2) ; v1(21.525,30.775) 23.45,28.85 26.8,28.85 28,27.65 v1(28.75,27.65) ; v1(28.65,29.6) 28.7,29.65 Mux1.6@28.7,31.55
  Bottom Layer w0.2: v1(21.3,14.2) 21.223,14.277 21.223,14.494 21.2,14.517 21.2,28.45 20.5,29.15 20.5,30.2 21.15,30.85 21.45,30.85 v1(21.525,30.775) ; v1(28.65,29.6) 28.65,29.492 28.8,29.342 28.8,27.7 v1(28.75,27.65)
VRTDN7: CF-8.2 Mux1.5 | length 15.4
  Top Layer w0.2: Mux1.5@29.35,31.55 29.35,29.9 29.8,29.45 32,29.45 33.1,28.35 34.65,28.35 39.3,23.7 CF-8.2@39.3,22.425
VRTDN8: CF-10.2 Mux1.4 | length 15.7
  Top Layer w0.2: Mux1.4@30,31.55 30,30.15 30.25,29.9 32.45,29.9 33.5,28.85 35.1,28.85 40.55,23.4 CF-10.2@40.55,22.425
VRTDP0: CLC-4.1 R12-4.1 | length 78.8
  Top Layer w0.2: CLC-4.1@41.417,35.35 42.3,36.233 42.3,48.1 54.6,60.4 54.6,64.7 61.9,72 v1(63.75,72) ; v1(78.1,73.25) 78.2,73.35 87.7,73.35 88.95,72.1 88.95,70.2 88.433,69.683 R12-4.1@85.55,69.683
  Bottom Layer w0.2: v1(63.75,72) 64.85,73.1 66.008,73.1 66.158,73.25 v1(78.1,73.25)
VRTDP1: CF-3_RP1.2 Mux1.19 | length 21
  Top Layer w0.2: CF-3_RP1.2@9.925,27.033 9.925,25.675 12.915,22.685 18.685,22.685 19.513,23.513 21.737,23.513 22.5,22.75 25.95,22.75 26.175,22.975 26.175,24.25 Mux1.19@26.1,24.325